# Altium PCB IoT-Button-PCB-v1.4.PcbDoc (part 2 of 2)
Units mil, origin at the board's own origin, x right, y up, seen from the top; angles counter-clockwise.
Board outline 3543.3 x 3267.72 mil, 2 copper layers (Top Layer, Bottom Layer), stack 46.063 mil thick; 61 components, 28 nets, 224 pads, 61 vias.
Unrouted connection lines stored in the file: 71.
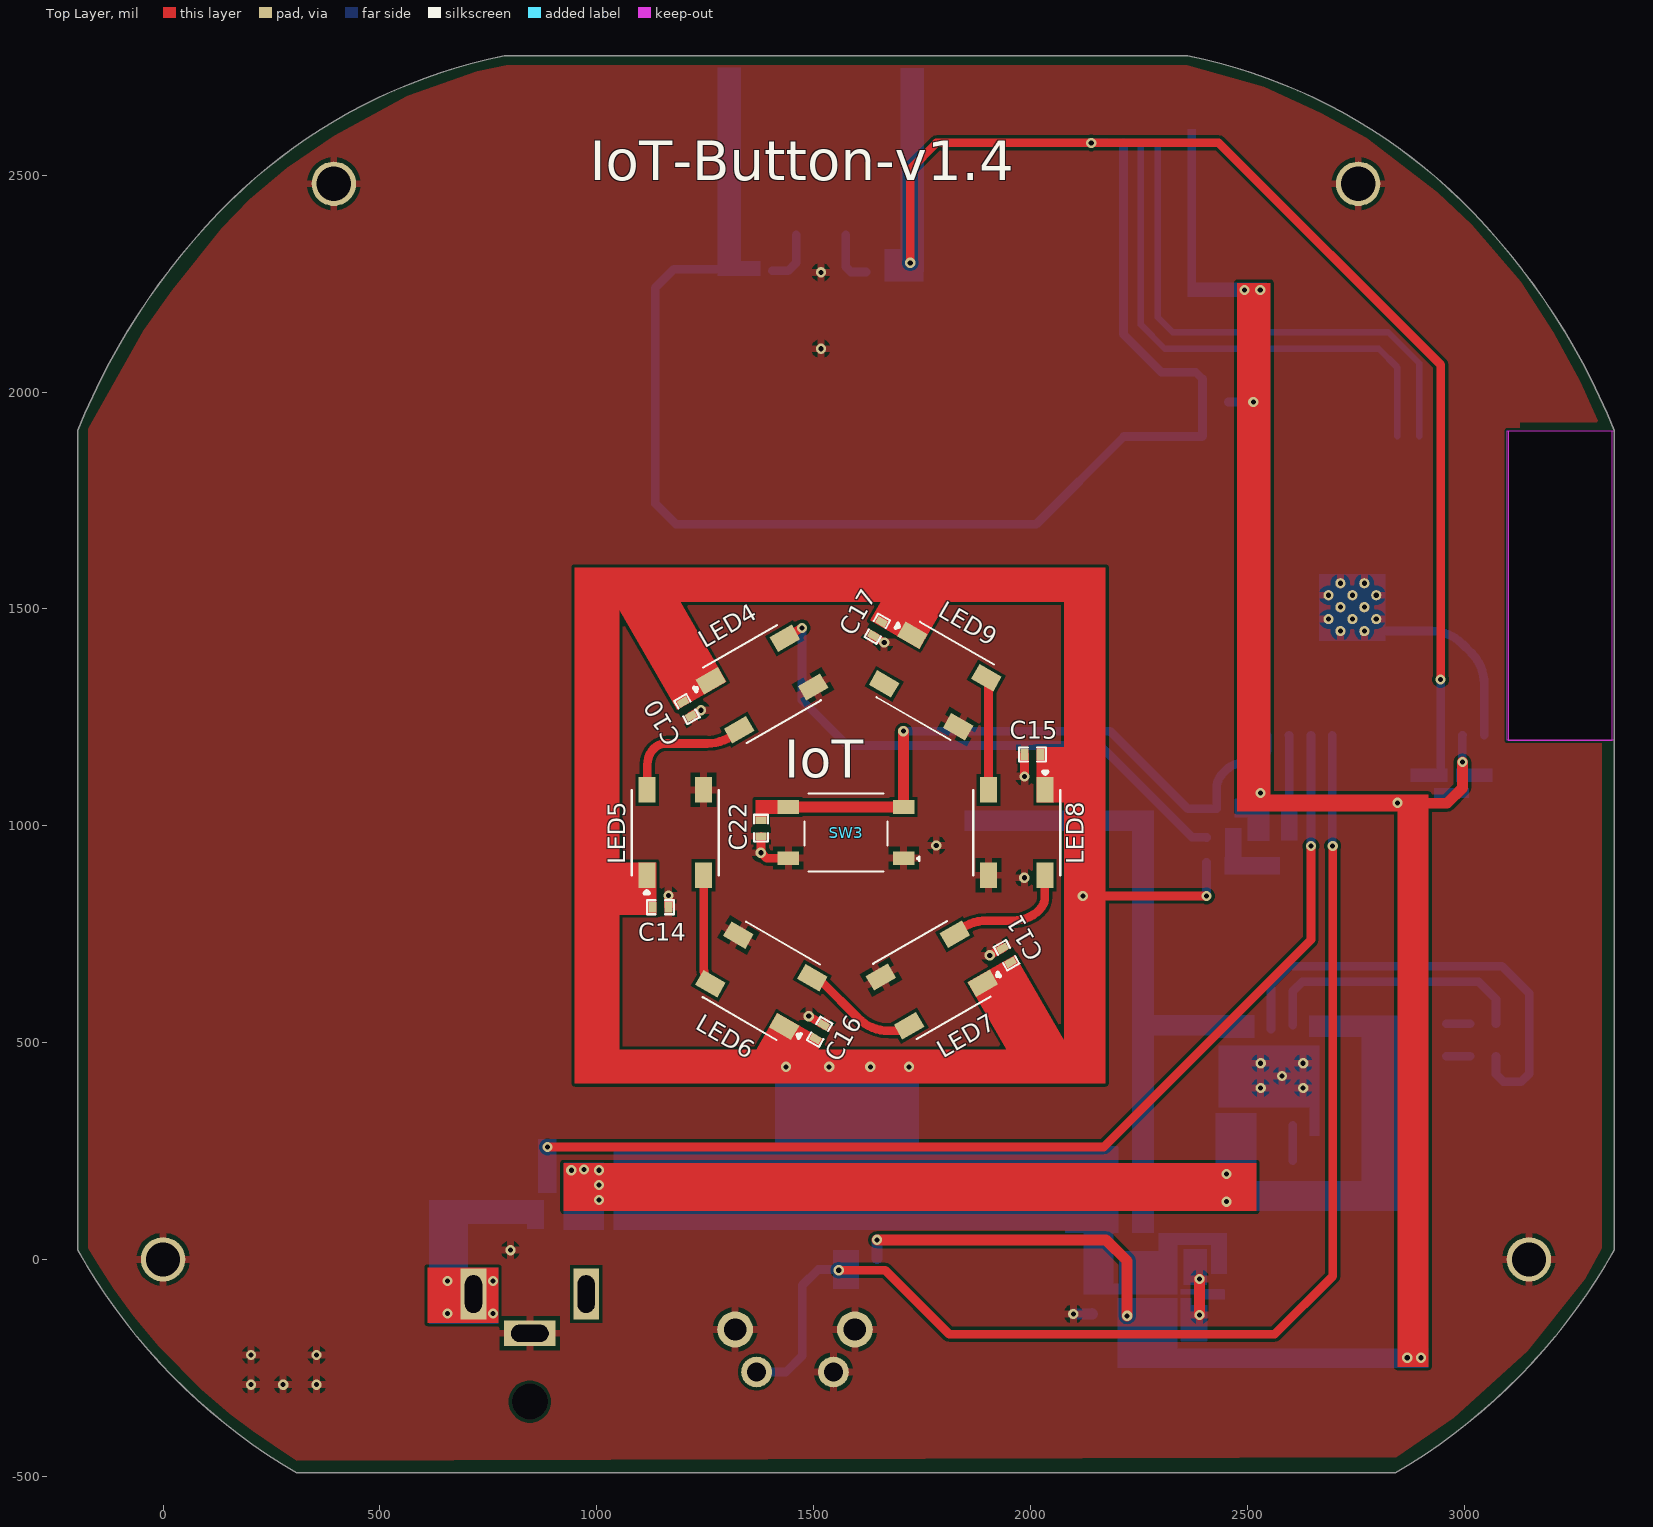
[diagram p0: Top Layer view]

## Via types
v1: diameter 23.62, hole 11.81, Top Layer to Bottom Layer, 61 vias

## Nets (pads, with @x,y where several pads share a name; then routed paths per layer and width w, separated by ;. In a path a pad name is that pad's centre, name@x,y a point inside that pad or via, vN(x,y) a via of type N, cw(c..) or ccw(c..) an arc to the next point about the centre after c; other vN are vias at no path point) (continued)
STDBY: (continued)
  Bottom Layer w20: U1.6@2555,530.82 2555,633 2598.25,676.25 3086.75,676.25 3150.1,612.9 3150.1,427.99 3131.41,409.31 3091.13,409.31 3073.53,426.91 LED1.2
TXD: J3.3 U2.35 | length 1217.7
  Bottom Layer w15: J3.3 2293.64,2172.36 2328,2138 2825,2138 2896.46,2066.54 U2.35
VIN: C7.2 C8.2 NT1.2 Q2.3 R6.2 U3.A1
pads on no net: J1.3 J1.MH LED9.2 U2.4 U2.5 U2.6 U2.7 U2.12 U2.13 U2.14 U2.15 U2.16 U2.17 U2.18 U2.19 U2.20 U2.21 U2.22 U2.23 U2.24 U2.26 U2.27 U2.28 U2.29 U2.30 U2.31 U2.32 U2.33 U2.36 U2.37

## Polygon pours and split planes (outlines as drawn)
GND on Top Layer "NONET_L02_P-001" (solid, remove dead copper, pour order 1): -172.03,1915.69 -172.03,25.92 -144.8,-19.17 -114.03,-67.64 -67.37,-131.4 -8.7,-201.53 89.08,-300.48 153.35,-356.33 207.97,-396.23 255.63,-429.22 308.15,-464.1 2843.29,-456.23 2976.45,-365.41 3145.76,-211.49 3277.97,-46.23 3317.97,25.92 3317.97,1359.25 3128.95,1359.25 3128.95,1930 3310.59,1930 3267.97,2023.77 3205.53,2138.24 3130.34,2254.26 3017.39,2386.21 2938.52,2460.51 2774.27,2586.57 2667.97,2643.77 2537.97,2703.77 2361.55,2753.77 790.8,2753.77 724.87,2739.4 564.37,2683.15 394.2,2591.33 286.7,2516.71 199.68,2444.25 134.95,2377.73 21.66,2234.7 -44.55,2142.71
GND on Bottom Layer "NONET_L02_P-001" (solid, remove dead copper, pour order 0): -172.03,1915.69 -172.03,25.92 -144.8,-19.17 -114.03,-67.64 -67.37,-131.4 -8.7,-201.53 89.08,-300.48 153.35,-356.33 207.97,-396.23 255.63,-429.22 308.15,-464.1 2841.34,-456.23 2987.97,-356.23 3141.97,-216.23 3277.97,-46.23 3317.97,25.92 3317.97,1359.25 3137.97,1359.25 3137.97,1930 3310.59,1930 3267.97,2023.77 3235.48,2083.33 3107.17,2281.33 3017.39,2386.21 2938.52,2460.51 2774.27,2586.57 2667.97,2643.77 2537.97,2703.77 2361.55,2753.77 793.19,2753.77 714.48,2736.62 573.09,2687.06 389.08,2587.77 286.7,2516.71 199.68,2444.25 134.95,2377.73 21.66,2234.7 -44.55,2142.71

## Other copper
Top Layer:
  rectangle net 3.3V: 2846,-248.31 2918,1072
  rectangle net 3.3V: 2477,1033 2918,1072
  rectangle net 3.3V: 2477,1033 2554,2252
  region net 5VCC: 2092.94,479.5 1964.33,702.26 1855.25,639.28 1983.86,416.52
  region net 5VCC: 1185.34,1266.27 1299.61,1332.24 1148.98,1593.13 1034.72,1527.16
  region net 5VCC: 1629.94,1473.21 1744.21,1407.24 1807,1516 1692.74,1581.97
  rectangle net 5VIN: 610,-147 773,-19
  rectangle net IOT_BUT: 1366.45,1027.56 1466.54,1059.06
  rectangle net IOT_BUT: 1366.45,1003.75 1391.45,1059.06
  rectangle net 5VDC: 923.14,112 2521,221.83
  rectangle net 5VCC: 953,794.5 1137.83,915.35
  region net 5VCC: 2173,484 951,484 951,405.75 2173,405.75
  rectangle net 5VCC: 949.05,406 1053,1595
  rectangle net 5VCC: 951,1516 2173.61,1595
  rectangle net 5VCC: 2077.11,408.25 2173.61,1595
  region net 5VCC: 2173.61,1181.5 2013.78,1181.5 2013.78,1053.15 2173.61,1053.15
  region net 5VCC: 1470.64,414.67 1523.83,506.8 1416.59,568.71 1363.41,476.59
Bottom Layer:
  rectangle net 5VCC: 2079.95,60.51 2203,259.25
  rectangle net VIN: 2204,-80.87 2334.61,19.84
  region net NetR6_1: 2449,-92.99 2449,-70.33 2388.61,-70.33 2388.61,-92.99
  region net NetR6_1: 2447.18,-81.11 2447.18,-68.19 2346.42,-68.19 2346.42,-81.11
  region net VIN: 2339.45,60.49 2295.36,60.49 2295.36,-24.01 2339.45,-24.01
  region net VIN: 2453.96,33.15 2453.96,60.51 2313.74,60.51 2313.74,33.15
  rectangle net VIN: 2416.15,-33.24 2453.96,51.26
  rectangle net GND: 2353.11,-59.5 2407.11,23.84
  region net GND: 2408,-105 2370.2,-105 2370.2,-189.5 2408,-189.5
  region net GND: 2371.11,-88.74 2346.56,-88.74 2346.56,-189.5 2371.11,-189.5
  rectangle net 3.3V: 2201.45,-251 2334.61,-89.33
  rectangle net VIN: 2326.36,-81.46 2339.28,23.84
  rectangle net GND: 2666,1426 2819,1581
  rectangle net BATT: 2235,516 2463,564
  rectangle net BATT: 2234,60.51 2285,1035
  rectangle net BATT: 2432.5,511 2516.76,564
  region net NetQ1_3: 2575.27,887 2575.27,928.13 2448,928.13 2448,887
  rectangle net NetQ1_3: 2448.35,891 2487.35,995
  rectangle net DIN: 2577.47,966.25 2616.47,1057.28
  rectangle net 3.3V: 2470.47,1019.25 2551.72,1062.25
  rectangle net 5VDC: 2427.35,111.25 2914,180.25
  region net EN: 2961.73,1132.19 2876.64,1132.19 2876.64,1100.81 2961.73,1100.81
  rectangle net 3.3V: 2980.92,1100.63 3066,1132
  rectangle net GND: 2931,1064 3011,1087
  rectangle net 5VDC: 2433.35,112.25 2516.76,333.62
  rectangle net GND: 2643.14,284.92 2666.76,470.3
  rectangle net GND: 2433.35,349.62 2666.76,493.58
  rectangle net 5VDC: 2427,112 2521,337
  region net EN: 1699.99,2747.62 1699.99,2276 1754.28,2276 1754.28,2747.62
  rectangle net 3.3V: 2500.47,964.25 2551.72,1092.32
  rectangle net BUTTON: 1545,-68 1605,21.5
  region net IO0: 1377.36,2302 1284.17,2302 1284.17,2267.5 1377.36,2267.5
  region net IO0: 1278.88,2747.91 1278.88,2267.5 1333.18,2267.5 1333.18,2747.91
  rectangle net 5VIN: 613.35,-149 773,-18.75
  rectangle net 5VDC: 2763.95,113.25 2913.95,562.18
  rectangle net BATT: 1847.91,988.11 2260,1035
  rectangle net 3.3V: 2362.53,2219.59 2547,2252.58
  rectangle net 3.3V: 2362.53,2219.59 2382.22,2606.04
  rectangle net EN: 1663.3,2255 1754,2330.3
  rectangle net 5VDC: 2642,513 2913.95,562.18
  rectangle net 5VCC: 1410.95,202.25 1742.95,482
  rectangle net 3.3V: 2326.36,-248 2339.28,-88.74
  rectangle net 3.3V: 2314.5,-251 2918,-206
  rectangle net 5VCC: 1264.95,68 2202.28,261.25
  rectangle net 5VCC: 1038.75,67.63 1748.77,259.25
  rectangle net 5VCC: 2122,-81 2192,172.64
  region net JACK_DET: 907,152.5 907,277 864,277 864,152.5
  rectangle net 5VDC: 923.14,67.63 1017,223
  rectangle net 5VIN: 621.35,81.25 878.49,137.14
  rectangle net 5VIN: 839.12,70.21 878.49,137.14
  rectangle net 5VIN: 613.35,-126.48 703.01,137.14
  rectangle net 5VIN: 621.35,-126.48 739.46,-47.74

## Silkscreen, mask and mechanical layers (free items; w line width, h text height)
Top Overlay:
  text "IoT-Button-v1.4" at 984.25,2458.89 h157.48
  text "IoT" at 1432.6,1082.03 h150
Bottom Overlay:
  drawing of 3084 lines, arcs and shapes, not listed
  text "SERIAL PROGRAMMING" at 2665.49,2365.44 h100
  text "ZERO CARBON FOOTPRINT" at 1040.45,1837.25 h38
  text "RESET" at 1567.68,1733 h150 r270
  text "BOOT" at 1299.18,1732.49 h150 r270
  text "Place Battery Here" at 1467,587 h150
  text "CHARGING" at 3297.91,582.17 h100
  text "FULLY CHARGED" at 3297.56,260.76 h100
  text "POWER" at 1015.54,-489.24 h150 r270
  text "INPUT" at 1681.49,-489.24 h150 r270
Deimensions:
  circle w10: c1574.8,984.25 r393.7
  lines w10: 1397.64,-492.13 1515.75,-492.13 ; 1397.64,-489.13 1397.64,-410.39 1515.75,-410.39 1515.75,-489.13 ; 722.96,-414 959.18,-414 959.18,-253.72 722.96,-253.72 722.96,-414 ; 772.17,-488.8 909.97,-488.8 909.97,-414 772.17,-414 772.17,-488.8 ; 1330.71,-410.39 1330.71,-288.34 1566.93,-288.34 1566.93,-410.39 1330.71,-410.39 ; 1456.69,866.14 1456.69,1102.36 1692.91,1102.36 1692.91,866.14 1456.69,866.14 ; 1515.75,984.25 cw(c1574.8,984.25) 1633.86,984.25 cw(c1574.8,984.25) 1515.75,984.25
Board Outline:
  lines w10: 1397.64,-492.13 1515.75,-492.13 ; 3100,1196.56 3100,1910.74 3346.45,1911.17 ccw(c1885.82,1322.48) 3021.65,2413.3 ccw(c2112.99,1540.64) 2362.2,2775.59 787.4,2775.59 ccw(c1036.62,1540.64) 127.96,2413.3 ccw(c1263.78,1322.48) -196.85,1911.17 -196.85,21.41 ccw(c1004.42,696.47) 307.28,-492.13 2842.32,-492.13 ccw(c2145.19,696.47) 3346.46,21.41 3346.45,1197.26 3100,1196.81 ; -39.37,0 cw(c0,0) 39.37,0 cw(c0,0) -39.37,0 ; 354.33,2480.32 ccw(c393.7,2480.32) 433.07,2480.32 ccw(c393.7,2480.32) 354.33,2480.32 ; 2716.54,2480.32 ccw(c2755.91,2480.32) 2795.28,2480.32 ccw(c2755.91,2480.32) 2716.54,2480.32 ; 3110.24,0 cw(c3149.61,0) 3188.98,0 cw(c3149.61,0) 3110.24,0
Fabrication:
  drawing of 191 lines, arcs and shapes, not listed
  text "Layer" at 4007.2,799 h60
  text "Name" at 4417.11,799 h60
  text "Material" at 5346.85,799 h60
  text "Thickness" at 6206.62,799 h60
  text "Constant" at 6856.46,799 h60
  text "Board Layer Stack" at 7426.32,799 h60
  text "Top Overlay" at 4417.11,679 h60
  text "Top Solder" at 4417.11,559 h60
  text "Solder Resist" at 5346.85,559 h60
  text "0.39mil" at 6206.62,559 h60
  text "3.5" at 6856.46,559 h60
  text "1" at 4007.2,439 h60
  text "Top Layer" at 4417.11,439 h60
  text "1.38mil" at 6206.62,439 h60
  text "Dielectric 1" at 4417.11,319 h60
  text "FR-4" at 5346.85,319 h60
  text "43.31mil" at 6206.62,319 h60
  text "4.8" at 6856.46,319 h60
  text "2" at 4007.2,199 h60
  text "Bottom Layer" at 4417.11,199 h60
  text "1.38mil" at 6206.62,199 h60
  text "Bottom Solder" at 4417.11,79 h60
  text "Solder Resist" at 5346.85,79 h60
  text "0.39mil" at 6206.62,79 h60
  text "3.5" at 6856.46,79 h60
  text "Bottom Overlay" at 4417.11,-41 h60
  text "Total board thickness:" at 4007.2,-161 h60
  text "46.85mil" at 6206.62,-161 h60
Drill Drawing:
  circle w10: c4014.48,1862.33 r33.33
  lines w10: 3981.15,1529 3981.15,1545.67 3997.81,1562.33 3981.15,1579 3981.15,1595.67 3997.81,1595.67 4014.48,1579 4031.15,1595.67 4047.81,1595.67 4047.81,1579 4031.15,1562.33 4047.81,1545.67 4047.81,1529 4031.15,1529 4014.48,1545.67 3997.81,1529 3981.15,1529 ; 3981.15,1695.67 3997.81,1695.67 4014.48,1679 4031.15,1695.67 4047.81,1695.67 4031.15,1712.33 4047.81,1729 4031.15,1729 4014.48,1745.67 3997.81,1729 3981.15,1729 3997.81,1712.33 3981.15,1695.67 ; 3981.15,2045.67 4047.81,2045.67 4014.48,1979 3981.15,2045.67 ; 3981.15,2145.67 3997.81,2145.67 3997.81,2129 4031.15,2129 4031.15,2145.67 4047.81,2145.67 4047.81,2179 4031.15,2179 4031.15,2195.67 3997.81,2195.67 3997.81,2179 3981.15,2179 3981.15,2145.67 ; 3981.15,2279 4014.48,2295.67 4047.81,2279 4031.15,2312.33 4047.81,2345.67 4014.48,2329 3981.15,2345.67 3997.81,2312.33 3981.15,2279
  lines w15: 3921.36,1484 13488.7,1484 ; 3921.36,2384 13488.7,2384 ; 4472.23,1334 4472.23,2534 ; 5012.09,1334 5012.09,2534 ; 6111.77,1334 6111.77,2534 ; 6617.65,1334 6617.65,2534 ; 7351.45,1334 7351.45,2534 ; 8851,1334 8851,2534 ; 9440.85,1334 9440.85,2534 ; 10186.65,1334 10186.65,2534 ; 10996.42,1334 10996.42,2534 ; 12086.1,1334 12086.1,2534 ; 3921.36,1334 13488.7,1334 13488.7,2534 3921.36,2534 3921.36,1334
  text "Symbol" at 4011.36,2429 h72
  text "Count" at 4517.23,2429 h72
  text "Hole Size" at 5057.09,2429 h72
  text "Plated" at 6156.77,2429 h72
  text "Hole Type" at 6662.65,2429 h72
  text "Drill Layer Pair" at 7396.45,2429 h72
  text "Via/Pad" at 8896,2429 h72
  text "Pad Shape" at 9485.85,2429 h72
  text "Template" at 10231.65,2429 h72
  text "Hole Length" at 11041.42,2429 h72
  text "Routed Path Length" at 12131.1,2429 h72
  text "73" at 4517.23,2279 h60
  text "11.81mil (0.300mm)" at 5057.09,2279 h60
  text "PTH" at 6156.77,2279 h60
  text "Round" at 6662.65,2279 h60
  text "Top Layer - Bottom Layer" at 7396.45,2279 h60
  text "(Mixed)" at 8896,2279 h60
  text "Rounded" at 9485.85,2279 h60
  text "(Mixed)" at 10231.65,2279 h60
  text "-" at 11041.42,2279 h60
  text "-" at 12131.1,2279 h60
  text "3" at 4517.23,2129 h60
  text "39.37mil (1.000mm)" at 5057.09,2129 h60
  text "PTH" at 6156.77,2129 h60
  text "Slot" at 6662.65,2129 h60
  text "Top Layer - Bottom Layer" at 7396.45,2129 h60
  text "Pad" at 8896,2129 h60
  text "Rectangle" at 9485.85,2129 h60
  text "(Mixed)" at 10231.65,2129 h60
  text "86.61mil (2.200mm)" at 11041.42,2129 h60
  text "47.24mil (1.200mm)" at 12131.1,2129 h60
  text "2" at 4517.23,1979 h60
  text "43.31mil (1.100mm)" at 5057.09,1979 h60
  text "PTH" at 6156.77,1979 h60
  text "Round" at 6662.65,1979 h60
  text "Top Layer - Bottom Layer" at 7396.45,1979 h60
  text "Pad" at 8896,1979 h60
  text "Rounded" at 9485.85,1979 h60
  text "c180h110" at 10231.65,1979 h60
  text "-" at 11041.42,1979 h60
  text "-" at 12131.1,1979 h60
  text "2" at 4517.23,1829 h60
  text "51.18mil (1.300mm)" at 5057.09,1829 h60
  text "PTH" at 6156.77,1829 h60
  text "Round" at 6662.65,1829 h60
  text "Top Layer - Bottom Layer" at 7396.45,1829 h60
  text "Pad" at 8896,1829 h60
  text "Rounded" at 9485.85,1829 h60
  text "c210h130" at 10231.65,1829 h60
  text "-" at 11041.42,1829 h60
  text "-" at 12131.1,1829 h60
  text "4" at 4517.23,1679 h60
  text "78.74mil (2.000mm)" at 5057.09,1679 h60
  text "PTH" at 6156.77,1679 h60
  text "Round" at 6662.65,1679 h60
  text "Top Layer - Bottom Layer" at 7396.45,1679 h60
  text "Pad" at 8896,1679 h60
  text "Rounded" at 9485.85,1679 h60
  text "c260h200m265" at 10231.65,1679 h60
  text "-" at 11041.42,1679 h60
  text "-" at 12131.1,1679 h60
  text "1" at 4517.23,1529 h60
  text "82.68mil (2.100mm)" at 5057.09,1529 h60
  text "NPTH" at 6156.77,1529 h60
  text "Round" at 6662.65,1529 h60
  text "Top Layer - Bottom Layer" at 7396.45,1529 h60
  text "Pad" at 8896,1529 h60
  text "Rounded" at 9485.85,1529 h60
  text "c0hn210m5" at 10231.65,1529 h60
  text "-" at 11041.42,1529 h60
  text "-" at 12131.1,1529 h60
  text "85 Total" at 4517.23,1379 h60
  text "Slot definitions :" at 4011.36,1234.03 h60
  text "Routed Path Length" at 5044.04,1234.03 h60
  text "= Calculated from tool start centre position to tool end centre position." at 6146.71,1234.03 h60
  text "Hole Length" at 5044.04,1134.05 h60
  text "= Routed Path Length + Tool Size = Slot length as defined in the PCB layout" at 5736.84,1134.05 h60

## Dimensions
2368,2784 to 2842.32,-492.13 on Deimensions
3346.46,21.41 to 3346.46,1911.17 on Deimensions
3346.46,21.41 to -196.85,21.41 on Deimensions
287,-494 to 2842.32,-492.13 on Deimensions
216.95,1638.62 to 216.95,260.25 on Bottom Overlay
216.95,1638.62 to 1594.9,1638.62 on Bottom Overlay

## Text inside footprints (layer, text, board x,y; h text height)
SW4: Bottom Overlay "PCB Edge" at 1541.2,-344.34 h39.37